# Allegro board LAY-94611_B2.brd
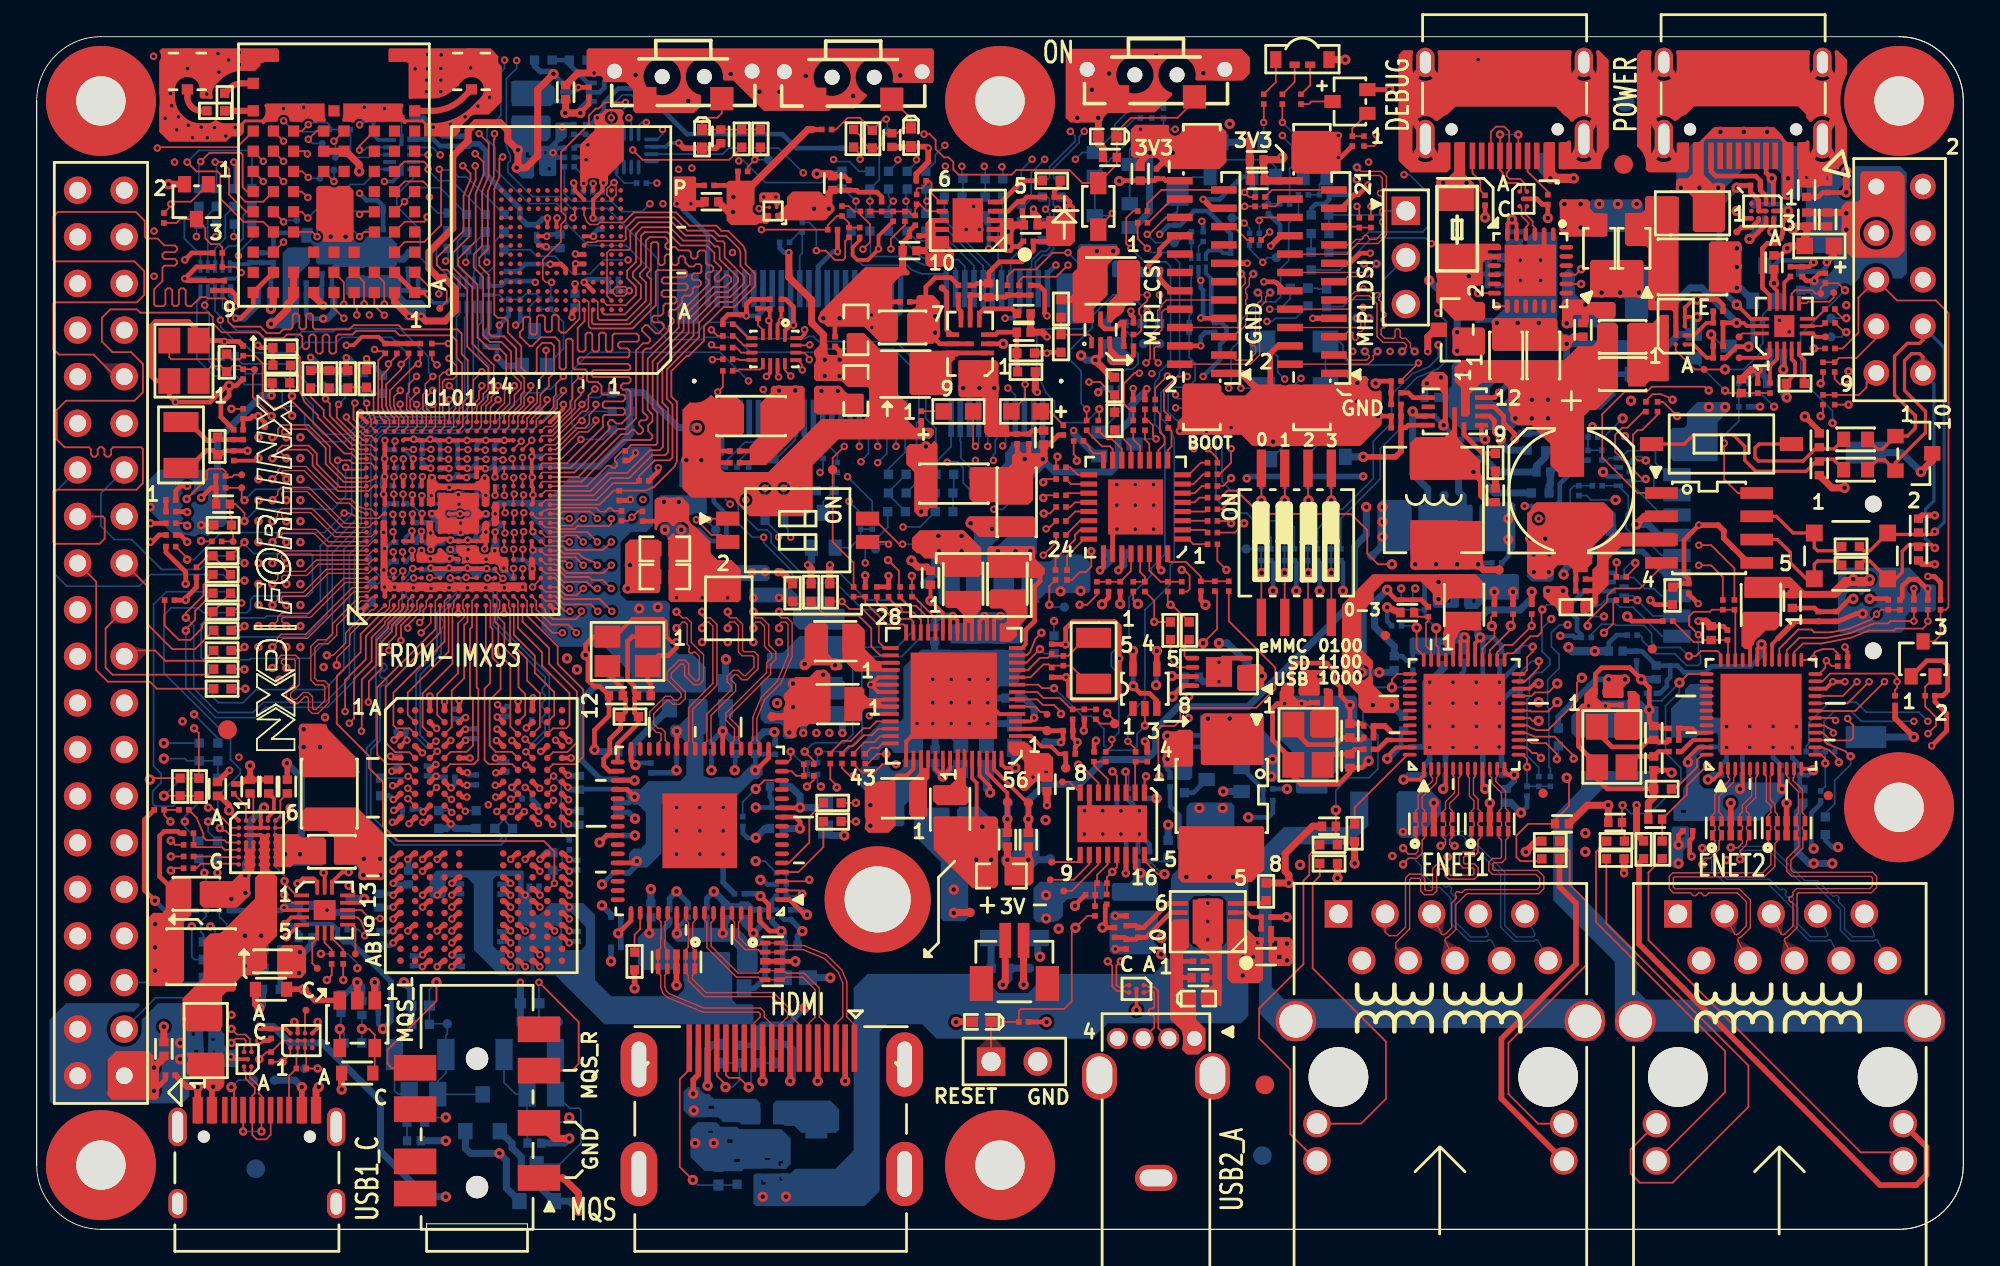
[diagram p0: board, top side]
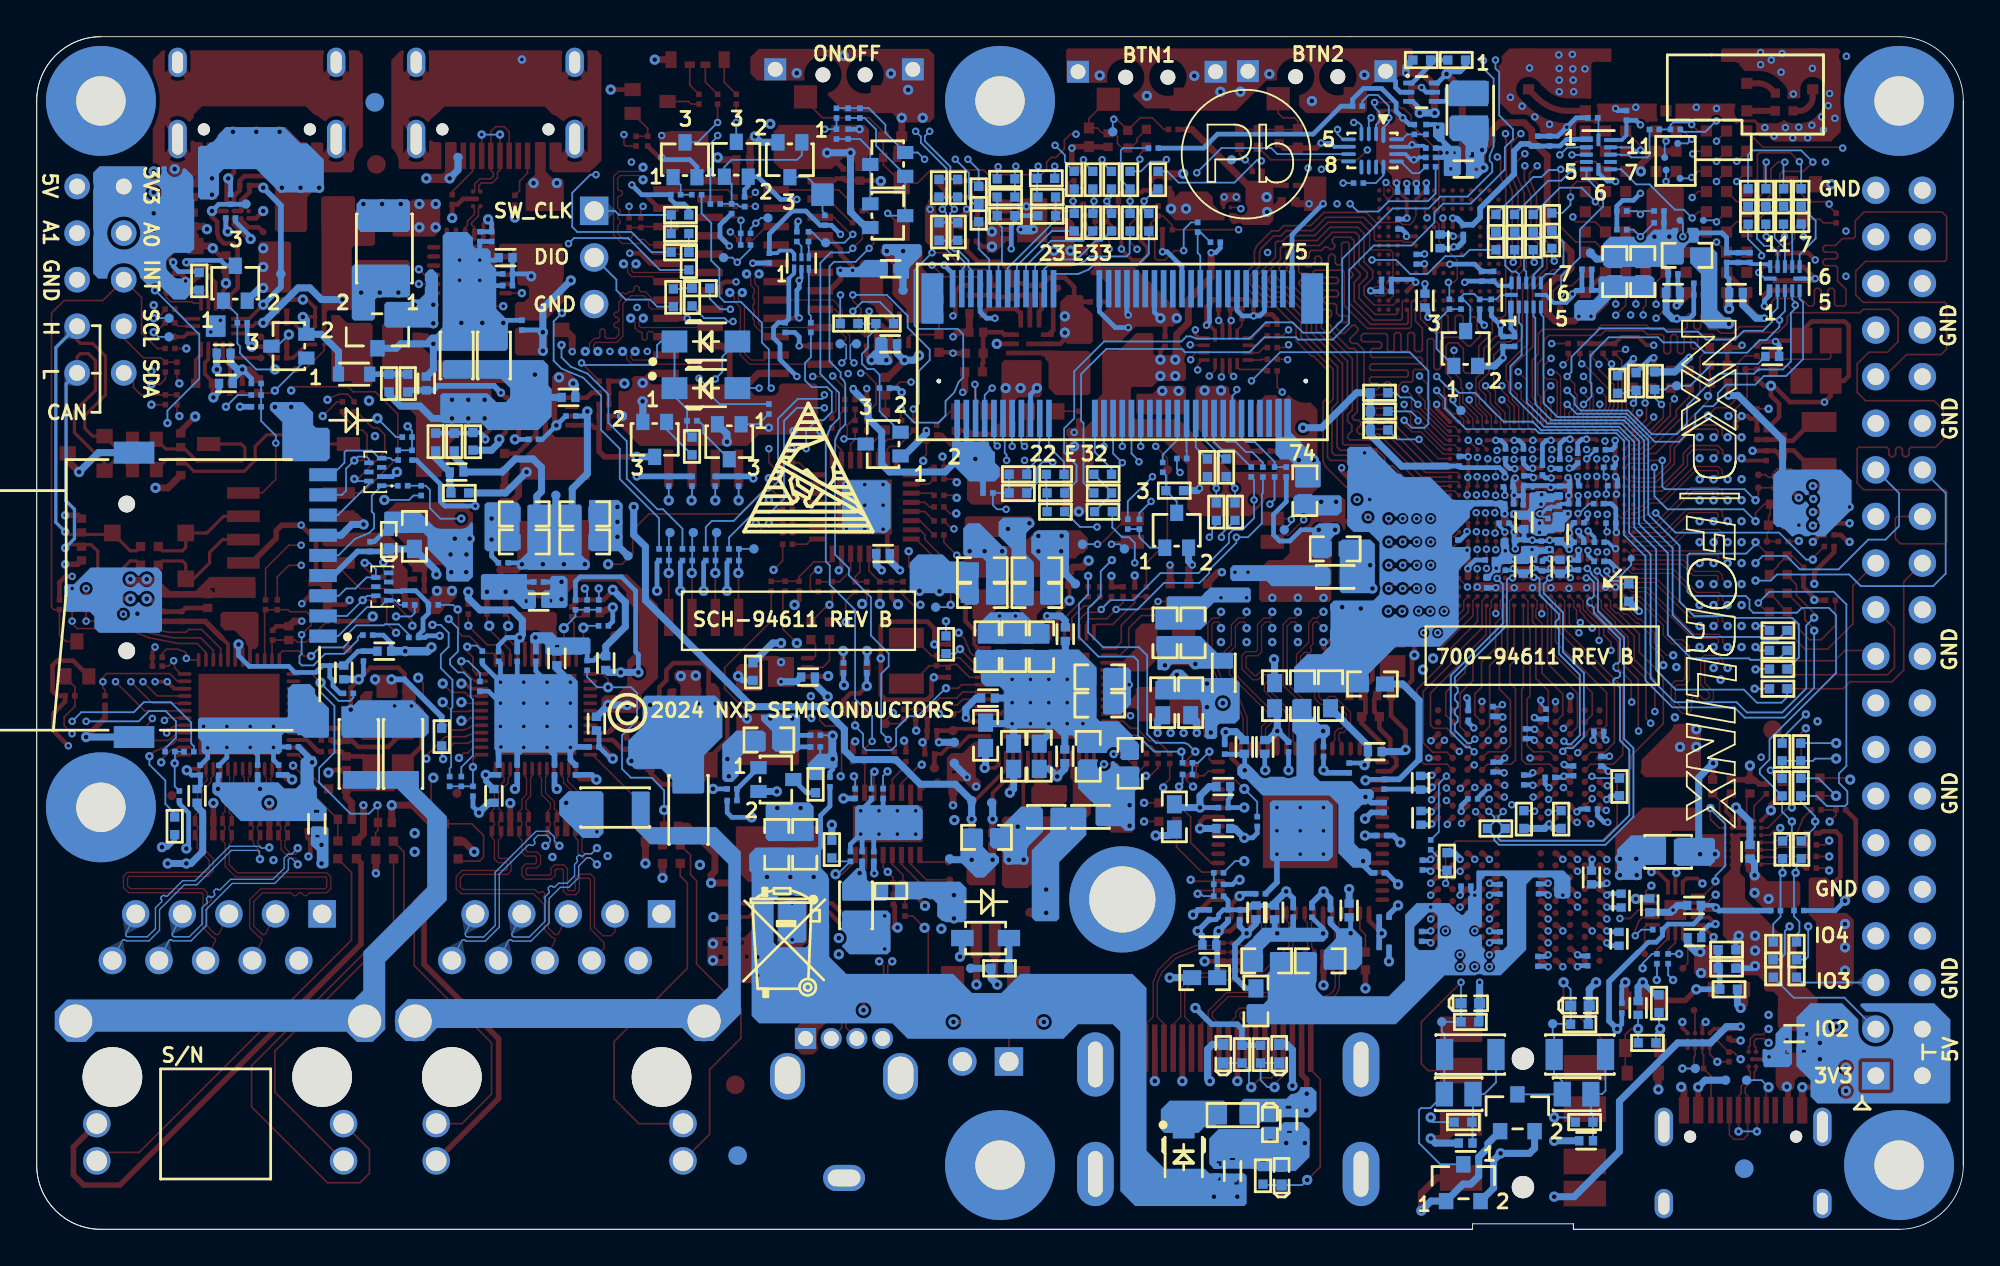
[diagram p1: board, bottom side, seen from below]

Outline 105 x 65 mm; copper layers: TOP, GND02, ART03, PWR04, PWR05, ART06, GND7, ART08, GND09, BOTTOM. Coordinates in mm from the lower left corner of the outline.
Outline path: 0,61.5 0,3.5 ; 0,61.5 arc(1.03,63.97) 3.5,65 101.5,65 ; 0,61.5 0,3.5 ; 0,3.5 arc(1.03,1.03) 3.5,0 ; 3.5,0 21.25,0 ; 3.5,0 21.25,0 ; 21.25,0 21.25,0.3 ; 21.25,0 21.25,0.3 ; 21.25,0.3 26.75,0.3 26.75,0 ; 26.75,0 52.5,0 ; 26.75,0 101.5,0 ; 26.75,0 101.5,0 ; 101.5,0 arc(103.97,1.03) 105,3.5 ; 101.5,0 arc(103.97,1.03) 105,3.5 ; 101.5,65 arc(103.97,63.97) 105,61.5 ; 101.5,65 arc(103.97,63.97) 105,61.5 ; 105,61.5 105,3.5 ; 105,61.5 105,3.5

## Design rules (mm)
constraint set DEFAULT: min track width 0.092
net group AA18_SD2_DATA1: nets AA18_SD2_DATA1 SD_DATA1
net group AA19_SD2_CLK: nets AA19_SD2_CLK SD_CLK
net group AA20_SD2_DATA3: nets AA20_SD2_DATA3 SD_DATA3
net group DEBUG_D: nets DEBUG_DN DEBUG_DP
net group DIFFPAIR13: nets A14_USB1_D_N B14_USB1_D_P
net group DIFFPAIR14: nets A15_USB2_D_N B15_USB2_D_P
net group DIFFPAIR20: nets N115899604 N115899615
net group EXP_GPIO_IO02: nets EXP_GPIO_IO02 K20_GPIO_IO02
net group EXP_GPIO_IO03: nets EXP_GPIO_IO03 K21_GPIO_IO03
net group EXP_GPIO_IO08: nets EXP_GPIO_IO08 M20_GPIO_IO08
net group EXP_GPIO_IO09: nets EXP_GPIO_IO09 M21_GPIO_IO09
net group EXP_GPIO_IO10: nets EXP_GPIO_IO10 N17_GPIO_IO10
net group EXP_GPIO_IO11: nets EXP_GPIO_IO11 N18_GPIO_IO11
net group M2_SD_CLK: nets M2_SD_CLK V16_SD3_CLK
net group M2_SD_CMD: nets M2_SD_CMD U16_SD3_CMD
net group M2_SD_DATA0: nets M2_SD_DATA0 T16_SD3_DATA0
net group M2_SD_DATA1: nets M2_SD_DATA1 V14_SD3_DATA1
net group M2_SD_DATA2: nets M2_SD_DATA2 U14_SD3_DATA2
net group M2_SD_DATA3: nets M2_SD_DATA3 T14_SD3_DATA3
net group M2_USB_D: nets M2_USB_DN M2_USB_DP
net group SD2_NDET: nets SD2_NDET Y17_SD2_NCD
net group SD_CMD: nets SD_CMD Y19_SD2_CMD
net group SD_DATA0: nets SD_DATA0 Y18_SD2_DATA0
net group SD_DATA2: nets SD_DATA2 Y20_SD2_DATA2
net group USB2_HOST_D: nets USB2_HOST_DN USB2_HOST_DP
net group USB_DEBUG_D: nets USB_DEBUG_DN USB_DEBUG_DP
net group USBC1_D: nets USBC1_DM USBC1_DP
net group Y11_SD1_CLK: nets N108612321 Y11_SD1_CLK
net group CLK: nets A18_CLKIN2 AA3_ENET2_RXC AA7_ENET1_RXC AA11_ENET1_MDC AA17_SD2_RESET_B B17_CLKIN1 BT_154_RST BT_RST C20_I2C1_SCL CAM_MCLK CAM_SCL CSI_NRST CTP_RST D20_I2C2_SCL DDC_SCL DDCSCL DRAM_NRESET DSI_SCL ENET1_NRST ENET1_RST ENET2_NRST ENET2_RST G17_PDM_CLK G20_SAI1_TXC I2C1_SCL I2C3_SCL I2C4_SCL I2C_IND_RST_15_4 I3C1_SCL I3C2_SCL I3C_SCL LD_I2C_SCL LVDS_NRST LVDS_RST M2_I2C_SCL M2_NPERST M2_PCM_CLK M2_SD_NRST PCF2131_SCL PD_I2C_SCL PMIC_SCLL RTC_CLK SD3_NRST SPI3_CLK SUSCLK SYS_NRST U4_CSI_MCLK U6_ENET2_TXC U10_ENET1_TXC USB_I2C_SCL USBC_I2C_SCL V4_CCM_CLKO4 VEN_SPI_CLK W2_BT_154_RST W2_JTAG_TCK W2_PCM_CLK W2_PCM_MCLK W2_SD_CLK W2_SPI3_CLK W2_WL_RST Y1_JTAG_TCK
net group POWER: nets ANVDD_1V8 APVDD_1V8 AVCC_3V3 CAN_VDD_5V CAN_VIO_3V3 DBG_ACC DEBUG_5V DSI&CAM_3V3 E14_USB2_VBUS_3V3 ENET1_AVDD3 ENET1_AVDDL ENET1_DVDD3 ENET1_DVDD_RGMII ENET1_DVDDL ENET2_AVDD3 ENET2_AVDDL ENET2_DVDD3 ENET2_DVDD_RGMII ENET2_DVDDL F12_USB1_VBUS_3V3 GND HDMI_5V ILIM_5V_VBUS IVDD_1V8 LPD4/X_VDD1 LPD4/X_VDD2 LPD4/X_VDDQ LPD4X_VDDQ_0V6 NVCC_BBSM_1V8 OVDD_3V3 PD_ILIM_5V_VBUS PVCC1_1V8 PVCC2_1V8 TXAVCC_1V8 TXAVCC_3V3 TXEMEM_VPP USB1_VBUS_IN USB_PD_VBUS_F VBBS VBUS1_DET_3V3 VBUS2_DET_3V3 VBUS_IN VBUS_USB2_5V VCC_3V3_DEBUG VCC_3V6 VDD_3V3 VDD_5V VDD_ANA_0V8 VDD_ANA_1V8 VDD_COIN_3V VDD_SNVS_0V8 VDD_SOC_0V8 VEXP_3V3 VEXP_5V VEXT_1V8 VINT VLDO1_3V3 VLDO3_1V8 VLDO_3V3 VPCIE_3V3 VSD_3V3 VSYS_5V

## Placement (name value [footprint] x y rotation side)
BH1  SMTSO-M2.5-5ET  [MH244-166T_202H]  45.83 17.98 180 bottom
BH2  MOUNTING HOLE  [HOLE2_7_6]  3.5 61.5 0 top
BH3  MOUNTING HOLE  [HOLE2_7_6]  52.5 61.5 0 top
BH4  MOUNTING HOLE  [HOLE2_7_6]  101.5 61.5 0 top
BH5  MOUNTING HOLE  [HOLE2_7_6]  101.5 23 0 top
BH6  MOUNTING HOLE  [HOLE2_7_6]  52.5 3.5 0 top
BH7  MOUNTING HOLE  [HOLE2_7_6]  3.5 3.5 0 top
C101  1uF  [C0201]  21.25 39.54 0 bottom
C102  1uF  [C0201]  21.19 40.53 0 bottom
C106  1uF  [C0201]  23.72 39.49 0 bottom
C107  1uF  [C0201]  22.02 39.16 90 bottom
C108  10uF  [C0402]  22.02 37.88 270 bottom
C109  1uF  [C0201]  23.72 39.98 0 bottom
C110  1uF  [C0201]  21.99 40.25 90 bottom
C111  1uF  [C0201]  22.56 39.56 270 bottom
C114  1uF  [C0201]  22.64 38.48 90 bottom
C116  1uF  [C0201]  22.52 24.63 180 bottom
C117  1uF  [C0201]  26.73 23.46 0 bottom
C118  1uF  [C0201]  19.88 39.55 180 bottom
C119  1uF  [C0201]  29.82 52.87 90 bottom
C124  10uF  [C0402]  23.95 38.54 270 bottom
C129  1uF  [C0201]  27.46 41.86 90 bottom
C130  1uF  [C0201]  22.94 41.38 90 bottom
C131  1uF  [C0201]  20.95 37.45 0 bottom
C132  1uF  [C0201]  21.99 41.71 90 bottom
C134  1uF  [C0201]  24.81 40.46 180 bottom
C135  1uF  [C0201]  20.95 38.51 0 bottom
C136  10uF  [C0402]  23.98 36.11 270 bottom
C137  1uF  [C0201]  23.94 37.33 90 bottom
C138  1uF  [C0201]  25.97 35.23 270 bottom
C139  1uF  [C0201]  20.2 22.91 0 bottom
C140  1uF  [C0201]  24.96 36.19 270 bottom
C141  1uF  [C0201]  29.49 19.85 270 bottom
C142  22uF  [C0603]  34.23 35.56 0 top
C143  22uF  [C0603]  34.23 37.08 0 top
C144  1uF  [C0201]  19.85 36.4 180 bottom
C145  1uF  [C0201]  25.03 38.49 180 bottom
C146  1uF  [C0201]  23.93 40.8 270 bottom
C147  1uF  [C0201]  21.02 42.03 90 bottom
C148  1uF  [C0201]  19.77 42.48 180 bottom
C149  1uF  [C0201]  19.84 37.45 180 bottom
C151  10uF  [C0402]  21.98 36.11 270 bottom
C152  1uF  [C0201]  19.86 27.13 180 bottom
C153  1uF  [C0201]  20.48 14.63 270 bottom
C154  1uF  [C0201]  25.24 15.95 270 bottom
C155  1uF  [C0201]  27.25 54.48 270 bottom
C156  1uF  [C0201]  24.72 37.52 180 bottom
C201  10uF  [C0402]  29.58 24.34 270 bottom
C202  10uF  [C0402]  18.65 17.91 90 bottom
C203  1uF  [C0201]  30.81 54.79 270 bottom
C204  1uF  [C0201]  27.55 37.3 90 bottom
C205  1uF  [C0201]  24.77 39.54 180 bottom
C206  10uF  [C0402]  29.56 22.42 90 bottom
C207  10uF  [C0402]  20.26 19.18 90 bottom
C208  1uF  [C0201]  25.62 25.19 90 bottom
C209  1uF  [C0201]  29.52 56.54 180 bottom
C210  1uF  [C0201]  23 37.24 90 bottom
C211  1uF  [C0201]  25.26 18.53 270 bottom
C212  1uF  [C0201]  25.79 36.48 0 bottom
C213  1uF  [C0201]  23.14 18.56 270 bottom
C214  1uF  [C0201]  23.96 24.49 270 bottom
C215  10uF  [C0402]  18.76 15.83 270 bottom
C216  1uF  [C0201]  29.52 15.96 270 bottom
C217  1uF  [C0201]  21.24 24.99 270 bottom
C218  1uF  [C0201]  23.19 14.61 270 bottom
C219  1uF  [C0201]  26.97 28.01 90 bottom
C220  1uF  [C0201]  20.98 36.21 270 bottom
C221  1uF  [C0201]  23.86 27.01 90 bottom
C222  1uF  [C0201]  22.94 36.15 270 bottom
C401  18pF  [C0201]  10.74 43.31 90 top
C402  18pF  [C0201]  10.74 42.16 270 top
C403  18pF  [C0201]  11.25 46.61 270 top
C404  18pF  [C0201]  11.25 47.88 90 top
C405  100nF  [C0402]  10.15 39.52 180 top
C501  4.7uF  [C0402]  28.52 53.85 270 bottom
C502  220nF  [C0201]  23.97 42.27 90 bottom
C503  220nF  [C0201]  24.95 42.27 90 bottom
C504  10uF  [C0402]  29.34 50.62 270 bottom
C505  220nF  [C0201]  19.75 25.52 90 bottom
C506  220nF  [C0201]  30.57 56.54 180 bottom
C507  220nF  [C0201]  27.11 18.7 0 bottom
C508  220nF  [C0201]  31.44 51.12 180 bottom
C509  1uF  [C0201]  31.44 51.78 180 bottom
C701  10uF  [C0603]  47.06 30.1 180 bottom
C702  10uF  [C0603]  47.06 28.57 180 bottom
C703  22uF  [C0603]  47.7 25.78 90 bottom
C704  1uF  [C0402]  48.97 25.78 90 bottom
C705  22uF  [C0603]  45.41 25.4 90 bottom
C706  1uF  [C0402]  53.16 28.96 180 bottom
C707  22uF  [C0603]  42.11 28.7 270 bottom
C708  22uF  [C0603]  43.63 28.7 270 bottom
C709  10uF  [C0603]  51.76 25.78 270 bottom
C710  22uF  [C0603]  43.51 32.51 90 bottom
C711  22uF  [C0603]  41.98 32.51 90 bottom
C712  10uF  [C0603]  53.21 31.75 90 bottom
C713  10uF  [C0603]  53.28 26.92 270 bottom
C714  22uF  [C0603]  50.49 35.94 0 bottom
C715  22uF  [C0603]  50.49 34.54 0 bottom
C716  18pF  [C0201]  55.32 30.35 270 top
C717  18pF  [C0201]  55.32 31.62 90 top
C718  10uF  [C0603]  51.73 31.75 90 bottom
C719  22uF  [C0603]  53.46 34.54 0 bottom
C720  22uF  [C0603]  53.46 35.94 0 bottom
C721  10uF  [C0603]  50.24 31.75 90 bottom
C722  22uF  [C0603]  52.57 19.25 0 top
C723  22uF  [C0603]  53.23 21.36 0 bottom
C724  1uF  [C0402]  48.94 32.44 90 bottom
C725  4.7uF  [C0402]  48.71 35.51 90 top
C726  10uF  [C0603]  50.36 25.78 90 bottom
C727  1uF  [C0201]  56.21 27.18 0 top
C728  1uF  [C0201]  56.33 25.91 0 top
C729  4.7uF  [C0402]  52.9 21.23 270 top
C730  4.7uF  [C0402]  55.06 24.26 270 top
C731  4.7uF  [C0402]  54.05 21.23 270 top
C810  18pF  [C0201]  33.01 38.86 270 top
C813  18pF  [C0201]  56.46 28.07 270 top
C814  100nF  [C0402]  10.41 47.57 180 bottom
C815  100nF  [C0402]  62.96 30.1 180 bottom
C817  1uF  [C0201]  10.03 41.05 180 top
C818  1uF  [C0201]  10.03 40.41 180 top
C819  220nF  [C0402]  79.5 40.01 270 top
C820  10uF  [C0805]  82.11 47.62 90 bottom
C821  10uF  [C0805]  82.11 47.62 90 top
C822  DNP  [C0402]  82.11 41.27 180 bottom
C823  10uF  [C0805]  80.08 47.62 90 bottom
C824  10uF  [C0805]  80.08 47.62 90 top
C825  100nF  [C0402]  76.02 45.34 180 bottom
C826  100nF  [C0402]  58.49 58.42 180 top
C827  22uF  [C0603]  78.43 37.47 0 bottom
C828  22uF  [C0603]  78.43 38.99 0 bottom
C829  22uF  [C0603]  75.13 37.47 180 bottom
C830  22uF  [C0603]  75.13 38.99 180 bottom
C831  100nF  [C0201]  79.57 36.32 0 bottom
C832  100nF_DNP  [C0402]  83.76 46.1 90 bottom
C833  100nF  [C0201]  75.89 44.32 0 bottom
C834  1uF  [C0201]  77.92 43.05 180 bottom
C835  100nF  [C0402]  46.61 59.36 270 top
C836  100nF  [C0402]  37.28 59.56 270 top
C837  22uF  [C0603]  65.1 26.67 0 bottom
C838  1uF  [C0201]  62.56 26.92 180 bottom
C839  22uF  [C0603]  64.66 20.98 90 bottom
C840  22uF  [C0603]  63.14 20.98 90 bottom
C842  100uF  [CCE6P3X7P7]  83.64 40.26 270 top
C843  4.7uF  [C1210]  90.24 52.45 0 top
C844  220nF  [C0402]  92.91 45.95 90 top
C845  2.2uF  [C0402]  94.69 46.1 0 bottom
C846  4.7uF  [C0402]  94.81 47.75 180 bottom
C847  100nF  [C0402]  94.69 52.7 270 top
C848  100nF  [C0201]  94.43 55.12 180 bottom
C849  4.7uF  [C1210]  86.05 53.45 90 bottom
C850  2.2uF  [C0402]  84.27 49.02 270 top
C851  100nF  [C0402]  17.72 12.06 90 bottom
C852  100nF  [C0201]  12.77 10.67 270 top
C853  4.7uF  [C1210]  8.96 14.86 180 top
C854  2.2uF  [C0402]  14.65 15.9 180 bottom
C855  4.7uF  [C0402]  14.68 17.65 0 bottom
C856  100nF  [C0402]  17.09 17.65 90 bottom
C857  10uF  [C0402]  76.65 31.11 270 bottom
C858  100nF  [C0201]  77.8 31.22 270 bottom
C859  1uF  [C0201]  78.81 31.22 270 bottom
C860  100nF  [C0201]  79.83 31.22 270 bottom
C861  1uF  [C0201]  79.83 25.04 90 bottom
C862  100nF  [C0201]  75.64 25.04 90 bottom
C863  100nF  [C0201]  74.62 26.29 0 bottom
C864  100nF  [C0201]  76.78 25.04 90 bottom
C865  100nF  [C0201]  78.81 25.04 90 bottom
C866  10uF  [C0402]  77.64 34.19 0 bottom
C867  100nF  [C0201]  77.64 35.28 0 bottom
C868  1uF_DNP  [C0201]  68.65 29.34 180 top
C869  22pF  [C0402]  71.57 27.18 90 top
C870  22pF  [C0402]  71.57 25.53 270 top
C871  10uF  [C0402]  88.27 30.35 270 bottom
C872  100nF  [C0201]  87.19 31.24 270 bottom
C873  1uF  [C0201]  98.06 33.4 90 top
C874  100nF  [C0201]  97.1 33.4 90 top
C875  1uF  [C0201]  96.08 25.02 90 bottom
C876  100nF  [C0201]  91.82 25.04 90 bottom
C877  100nF  [C0201]  92.96 25.04 90 bottom
C878  100nF  [C0201]  91 26.29 0 bottom
C879  100nF  [C0201]  95.07 25.02 90 bottom
C880  10uF  [C0402]  95.68 34.24 270 top
C881  100nF  [C0201]  89.99 21.72 0 top
C882  1uF_DNP  [C0201]  85.21 29.29 180 top
C883  22pF  [C0402]  88.13 27.05 90 top
C884  22pF  [C0402]  88.13 25.4 270 top
C885  10uF  [C0402]  41.09 15.49 0 bottom
C886  100nF  [C0201]  40.08 17.14 90 bottom
C887  10uF  [C0402]  40.33 24.13 180 bottom
C888  100nF  [C0201]  40.33 22.99 180 bottom
C889  10uF  [C0402]  33.47 17.38 90 bottom
C890  100nF  [C0201]  34.49 17.16 90 bottom
C891  10uF  [C0402]  40.33 21.84 180 bottom
C892  100nF  [C0201]  31.57 17.02 180 bottom
C893  100nF  [C0201]  38.3 18.29 180 bottom
C894  100nF  [C0201]  31.57 24.26 270 bottom
C895  100nF  [C0201]  31.57 15.37 180 bottom
C896  10uF  [C0402]  32.08 26.04 180 bottom
C897  100nF  [C0201]  33.47 25.15 270 bottom
C898  10uF  [C0402]  38.07 26.29 270 bottom
C899  100nF  [C0201]  36.77 26.29 270 bottom
C900  100nF  [C0201]  31.69 21.46 0 bottom
C901  10uF  [C0402]  38.55 17.27 90 bottom
C902  100nF  [C0201]  39.44 17.14 90 bottom
C903  10uF  [C0402]  39.19 26.29 90 bottom
C904  100nF  [C0201]  40.25 26.16 90 bottom
C905  100nF  [C0201]  34.87 26.04 270 bottom
C906  100nF  [C0201]  31.57 22.99 270 bottom
C907  100nF  [C0201]  31.82 19.43 180 bottom
C908  10uF  [C0402]  37.54 17.27 90 bottom
C909  100nF  [C0201]  35.5 17.27 90 bottom
C910  100nF  [C0201]  36.52 17.27 90 bottom
C911  100nF  [C0201]  40.71 3.17 90 bottom
C912  10uF  [C0402]  39.82 3.17 90 bottom
C913  1uF  [C0402]  36.77 5.97 270 bottom
C914  15pF  [C0402]  33.09 29.08 180 top
C915  15pF  [C0402]  31.57 29.08 0 top
C916  1uF  [C0201]  40.58 18.16 180 bottom
C917  10uF  [C0402]  58.49 48.26 180 bottom
C918  10uF  [C0402]  58.47 52.35 0 bottom
C919  100nF  [C0201]  61.03 57.53 90 top
C920  100nF  [C0201]  64.21 49.15 270 bottom
C921  100nF  [C0201]  65.07 52.93 270 bottom
C922  10uF  [C0402]  66.49 58.29 180 top
C923  10uF  [C0402]  60.14 57.53 90 top
C924  10uF  [C0402]  66.54 57.16 180 top
C925  0.1uF  [C0402]  58.87 36.83 180 bottom
C926  100nF  [C0201]  59.05 35.03 270 top
C927  100nF  [C0201]  47.32 50.55 180 top
C928  47uF  [C0805]  47.19 49.15 180 top
C929  1000pF  [C0402]  53.79 48.9 180 top
C930  22uF  [C0603]  44.65 45.72 270 top
C931  22uF  [C0603]  44.65 49.02 90 top
C932  100nF  [C0201]  43.51 48.39 90 top
C933  1000pF  [C0402]  53.79 49.91 0 top
C934  0.1uF  [C0402]  51.89 51.18 90 top
C935  1uF  [C0201]  9.6 51.44 90 top
C936  10nF  [C0201]  10.23 51.44 90 top
C937  10nF  [C0201]  12.26 52.96 90 bottom
C938  1uF  [C0201]  11.63 52.96 90 bottom
C939  1uF  [C0201]  24.46 48.39 270 bottom
C940  10nF  [C0201]  25.09 48.39 270 bottom
C941  1uF  [C0201]  26.23 51.94 90 bottom
C942  10nF  [C0201]  25.6 51.94 90 bottom
C943  100nF  [C0201]  54.07 43.08 90 top
C944  100nF  [C0201]  53.44 43.08 90 top
C945  100nF  [C0201]  38.04 41.78 0 top
C946  100nF  [C0201]  38.04 42.42 0 top
C947  10uF  [C0402]  54.88 43.15 90 top
C948  100uF  [C1206]  53.41 39.62 270 top
C949  100uF  [C1206]  38.93 44.32 0 top
C950  100uF  [C1206]  49.98 40.64 180 top
C951  10uF  [C0402]  28.83 61.98 90 top
C952  10uF  [C0402]  27.25 57.78 0 bottom
C953  100nF  [C0201]  27.25 58.67 0 bottom
C954  22uF  [C0603]  18.99 52.2 90 bottom
C955  22uF  [C0603]  17.47 52.2 90 bottom
C956  1uF  [C0201]  20.52 52.32 0 bottom
C957  100nF  [C0201]  20.52 51.18 0 bottom
C958  100nF  [C0201]  12.9 52.96 90 bottom
C959  10uF  [C0402]  12.39 51.05 180 bottom
C960  22uF  [C0603]  35.89 40.26 270 bottom
C961  22uF  [C0603]  15.06 53.09 0 bottom
C962  1uF  [C0201]  14.42 50.93 0 bottom
C963  100nF  [C0201]  14.42 51.56 0 bottom
C964  100nF  [C0201]  15.82 52.07 0 bottom
C965  10uF  [C0402]  15.82 51.05 0 bottom
C966  10uF  [C0402]  36.77 56.01 180 top
C967  100nF  [C0201]  36.65 56.9 180 top
C968  10uF  [C0402]  43.38 57.02 90 top
C969  100nF  [C0201]  44.27 56.9 90 top
C970  10uF  [C0402]  6.93 9.83 90 top
C971  100nF  [C0201]  7.28 8.41 0 top
C972  10uF  [C0402]  9.22 10.67 0 bottom
C973  100nF  [C0201]  9.22 9.78 0 bottom
C976  10uF  [C0402]  54.17 54.74 0 top
C977  100nF  [C0201]  54.05 53.85 0 top
C978  10uF  [C0402]  47.57 53.34 180 top
C979  100nF  [C0201]  47.82 54.14 180 top
C980  100nF  [C0201]  55.19 56.26 0 top
C981  100nF  [C0201]  48.2 57.15 180 top
C982  10uF  [C0402]  97.61 55.04 270 top
C983  100nF  [C0402]  96.46 55.04 270 top
C984  10uF  [C0402]  96.46 56.64 90 top
C985  100nF  [C0201]  97.61 56.77 90 top
C986  22uF  [C0603]  84.42 37.77 90 bottom
C987  100nF  [C0201]  86.83 37.21 90 bottom
C988  22uF  [C0805]  27.5 7.37 0 bottom
C989  100uF  [C1206]  26.87 9.53 0 bottom
C990  0.033uF  [C0402]  27.12 4.7 0 bottom
C991  22uF  [C0805]  21.08 7.37 0 bottom
C992  100uF  [C1206]  20.9 9.53 0 bottom
C993  0.033uF  [C0402]  20.56 4.83 0 bottom
C994  4.7uF  [C0402]  79.45 52.96 0 bottom
C995  100nF  [C0201]  80.21 54.1 270 bottom
C996  100nF  [C0201]  79.34 52.07 0 bottom
C997  1uF  [C0201]  80.84 54.1 270 bottom
C998  100nF  [C0201]  39.95 50.42 90 top
C999  100nF  [C0201]  40.58 50.42 90 top
C1000  2.2uF  [C0201]  78.56 49.28 90 bottom
C1001  1uF  [C0201]  79.34 51.44 0 bottom
C1005  1uF  [C0201]  84.15 34.8 180 top
C1006  100nF  [C0201]  84.15 35.43 180 top
C1007  56PF  [C0402]  102.56 38.35 270 top
C1008  1uF  [C0201]  90.04 34.92 270 top
C1009  56PF  [C0402]  97.15 43 90 top
C1010  56PF  [C0402]  97.15 41.48 270 top
C1011  56PF  [C0402]  102.56 36.83 270 top
C1012  100nF  [C0402]  9.85 24 90 top
C1013  1nF  [C0402]  11.63 24.13 90 top
C1014  10nF  [C0402]  13.66 24.13 90 top
C1015  4.7uF  [C0402]  12.64 24.13 90 top
C1016  10uF  [C1210]  15.95 23.75 90 top
C1017  47uF  [C0805]  8.71 18.29 180 top
C1018  100nF  [C0402]  11.63 20.57 90 bottom
C1019  100nF  [C0201]  61.77 24.38 270 bottom
C1021  470pF  [C0402]  83.13 22.1 0 top
C1022  18pF  [C0402]  74.7 33.6 180 top
C1023  470pF  [C0402]  70.43 21.97 180 top
C1024  470pF  [C0402]  88.21 22.35 180 top
C1025  470pF  [C0402]  86.02 22.17 180 top
C1026  18pF  [C0402]  91.26 32.49 90 top
C1027  10uF  [C0402]  67 14.86 0 top
C1028  100nF  [C0201]  67 15.75 0 top
C1029  10uF  [C0402]  63.32 13.72 0 top
C1030  100nF  [C0201]  63.32 14.61 0 top
C1031  100nF  [C0201]  67 16.38 0 top
C1032  100nF  [C0201]  59.38 16.81 90 top
C1033  47uF  [C0805]  60.35 17.65 270 bottom
C1034  100nF  [C0201]  60.02 20.32 90 bottom
C1035  100nF  [C0201]  60.65 20.32 90 bottom
C1036  100nF  [C0201]  59.38 20.32 90 bottom
C1037  100nF  [C0201]  53.79 11.3 180 top
C1038  100nF  [C0201]  59.76 30.61 270 bottom
C1041  1uF  [C0201]  22.55 59.31 90 bottom
C1042  10nF  [C0201]  23.19 59.31 90 bottom
C1043  1uF  [C0201]  18.36 60.71 90 bottom
C1044  100nF  [C0201]  29.03 58.93 180 bottom
C1045  1uF  [C0201]  60.78 60.83 270 bottom
C1047  100nF  [C0201]  29.03 58.42 180 bottom
C1048  1000pF  [C1206]  69.48 22.86 270 bottom
C1049  1000pF  [C1206]  85.03 25.91 270 bottom
D601  LED RED  [LED0603]  97.16 53.59 180 top
D602  ESD5451N-2/TR  [0402TVS]  58.36 59.56 180 top
D603  BZX585-B3V3  [SOD523]  87.7 46.61 0 bottom
D604  ESD5451N-2/TR  [0402TVS]  47.65 59.52 270 top
D605  ESD5451N-2/TR  [0402TVS]  36.27 59.44 270 top
D606  BAT54HT1  [SOD323]  87.07 53.47 0 top
D607  BAT54HT1  [SOD323]  85.16 53.47 0 top
D608  BZX585-B3V3  [SOD523]  12.77 13.08 180 top
D609  ESD5451N-2/TR  [0402TVS]  37.79 5.71 270 bottom
D610  ESD5341N  [0402TVS]  40.33 9.57 90 bottom
D611  ESD5341N  [0402TVS]  37.28 9.57 90 bottom
D612  ESD5341N  [0402TVS]  37.16 2.92 90 bottom
D613  LED GREEN  [LED0603]  53.92 44.58 180 top
D614  LED_ORANGE  [LED0603]  50.24 44.58 0 top
D615  ESD5451N-2/TR  [0402TVS]  85.81 37.59 90 bottom
D616  PUSB3AB6Z  [DFN2111_7]  86.07 35.03 0 bottom
D617  PUSB3AB6Z  [DFN2111_7]  86.45 41.27 0 bottom
D618  BAT54S  [SOT23_A]  27.25 2.54 180 bottom
D619  ESD5451N-2/TR  [0402TVS]  26.87 12.32 180 bottom
D620  ESD5451N-2/TR  [0402TVS]  20.89 12.19 180 bottom
D621  BAT54S  [SOT23_A]  24.3 6.35 180 bottom
D623  PSM712-LF-T7  [SOT23_A]  102.31 42.29 270 top
D624  RB521S-30  [SOD523]  17.47 8.51 180 top
D626  ESD5451N-2/TR  [0402TVS]  63.32 12.57 0 top
D627  BAT54HT1  [SOD323]  53.28 15.88 90 bottom
D628  ESD5451N-2/TR  [0402TVS]  51.51 11.3 180 top
D629  BAT54HT1  [SOD323]  57.86 55.75 180 top
F1  7A  [FUSE_3P4X1P8]  90.24 55.37 180 top
F2  7A  [FUSE_3P4X1P8]  9.22 10.29 90 top
F3  FUSE_0.5A  [F1206]  77.41 54.36 270 top
F5  FUSE_0.04A  [F0603]  39.82 6.22 180 bottom
FB16  1K  [FB0603]  34.23 37.08 180 bottom
FB17  120 Ohm  [FB0402]  73.99 30.86 90 bottom
FB18  120 Ohm  [FB0402]  80.08 23.62 90 bottom
FB19  120 Ohm  [FB0402]  74.49 27.56 270 bottom
FB20  120 Ohm  [FB0402]  86.06 31.51 0 bottom
FB21  120 Ohm  [FB0402]  96.26 23.62 90 bottom
FB22  120 Ohm  [FB0402]  89.73 22.1 90 bottom
FB23  60 Ohm  [FB0603]  41.35 13.72 180 bottom
FB24  60 Ohm  [FB0603]  43 22.48 90 bottom
FB25  60 Ohm  [FB0603]  35.05 14.63 180 bottom
FB26  60 Ohm  [FB0603]  32.2 29.72 180 bottom
FB27  60 Ohm  [FB0603]  34.49 29.08 270 bottom
FB28  60 Ohm  [FB0603]  37.54 29.08 270 bottom
FB29  60 Ohm  [FB0603]  38.55 12.45 90 bottom
FB30  60 Ohm  [FB0603]  36.01 29.08 270 bottom
FB31  60 Ohm  [FB0603]  37.97 14.63 0 bottom
K1  -  [KEY_3_5X7]  61 62.92 180 top
K2  -  [KEY_3_5X7]  44.5 62.79 180 top
K3  -  [KEY_3_5X7]  35.24 62.82 180 top
L701  0.47uH  [IND_2016A]  47.19 23.5 180 top
L702  0.47uH  [IND_2016A]  43.66 28.63 180 top
L703  0.47uH  [IND_2016A]  43.53 32.05 180 top
L704  0.47uH  [IND_2016A]  50.49 35.18 90 top
L705  0.47uH  [IND_2016A]  52.9 35.18 90 top
L706  0.47uH  [IND_2016A]  49.78 22.89 270 top
L707  1.5uH  [IND_0518]  76.14 39.75 270 top
L708  2.2uH  [IND_2016A]  77.8 34.04 90 top
L709  2.2uH  [IND_2016A]  93.97 34.04 90 top
L710  1.0uH  [IND_SPH2520]  58.49 51.69 180 top
L711  0.47uH  [IND_SPH2520]  47.32 46.61 180 top
L712  1.0uH  [IND_SPH2520]  26.87 60.96 270 bottom
L713  DLW43SH510XK2  [IND_DLW43]  98.88 36.7 0 top
LED1  RGB_LED  [SMD_RGB_1_5X3]  68.98 63.42 180 top
NOREF  -  [unnamed]  10.4 27.23 0 top
NOREF#2  -  [#2]  3.5 70 0 top
NOREF#3  -  [#2]  -26.03 -18.71 0 top
NOREF#4  -  [#2]  -24.47 -34.57 0 top
NOREF#5  -  [#2]  110 0 0 top
NOREF#6  -  [#2]  -150.27 73 0 top
NOREF#7  -  [#2]  -293.87 -184.4 0 top
NOREF#8  -  [#2]  105 136.36 90 top
NOREF#9  -  [#2]  276.75 -58.31 0 top
NOREF#10  -  [unnamed]  66.93 7.87 0 top
NOREF#11  -  [unnamed]  86.49 58.04 0 top
NOREF#12  -  [#2]  -267.86 340.75 0 top
NOREF#13  -  [#2]  3.5 3.5 0 top
NOREF#14  -  [#2]  3.5 135 0 top
NOREF#15  -  [#2]  0 0 0 top
NOREF#16  -  [#2]  129.97 24.66 0 top
NOREF#17  -  [#2]  3.5 65 0 top
NOREF#18  -  [#2]  47.42 -99.42 0 top
NOREF#19  -  [#2]  105 136.36 0 top
NOREF#20  -  [#2]  0 0 0 top
NOREF#21  -  [#2]  -293.87 -184.4 0 top
NOREF#22  -  [#2]  -30.39 -12.62 0 top
NOREF#23  -  [#2]  0 139.54 90 top
NOREF#24  -  [#2]  3.5 3.5 0 top
NOREF#25  -  [unnamed]  11.94 3.3 180 bottom
NOREF#26  -  [unnamed]  86.57 61.42 180 bottom
NOREF#27  -  [#2]  63.63 41.02 180 bottom
NOREF#28  -  [unnamed]  66.8 4.02 180 bottom
NOREF#29  -  [#2]  61.72 15.75 180 bottom
P1  Type_C_16P  [TYPEC_16P_S]  93.23 61.36 180 top
P2  Type_C_16P  [TYPEC_16P_S]  11.77 3.64 0 top
P3  FC-H021LNL  [RJ45-GIGABIT]  76.92 10.45 180 top
P4  FC-H021LNL  [RJ45-GIGABIT]  95.42 10.45 180 top
P5  HDMI_A  [HDMIA19_HDMI_01A]  39.91 4.77 180 top
P6  -  [FPC_22P_0_5]  63.5 51.9 90 top
P7  -  [FPC_22P_0_5]  69.5 51.9 90 top
P8  M.2 SKT KEY-E  [CON_75_0P5_22X9_RA1]  45.83 47.91 180 bottom
P9  U_FL_DNP  [IPEX_4]  23.69 63.11 90 top
P10  U_FL_DNP  [IPEX_4]  8.21 63.11 90 top
P11  TSM-120-01-F-DV-A  [HDR220_TSM_A_SM]  3.55 32.46 90 top
P12  Header-5x2-2.54  [HEADER5X2_25]  101.6 51.73 270 top
P13  CONN_SD_CARD 9  [CON9_SDCARD_1P1MM]  96.36 33.83 270 bottom
P14  Header-5x1-2.54  [HEADER_2_54_3P]  74.62 52.97 270 top
P15  PJ_3536X  [PJ3930_8P]  24 6.37 90 top
P16  Type_C_16P  [TYPEC_16P_S]  80.23 61.36 180 top
P17  -  [USB_A_V]  61 10.4 0 top
P18  JST_SH_2P  [SH_2P]  53.28 15.75 0 top
P19  Header-2x1-2.54  [HEADER_2X1_254]  53.28 9.14 0 top
Q1  L2SK3018WT1G  [SC70_3]  64.71 24.51 270 bottom
Q2  L2SK3018WT1G  [SC70_3]  66.87 58.32 180 bottom
Q3  L2SK3018WT1G  [SC70_3]  69.67 58.29 180 bottom
Q4  L2SK3018WT1G  [SC70_3]  71.57 61.47 90 top
Q5  L2SK3018WT1G  [SC70_3]  63.95 58.29 0 bottom
Q6  L2SK3018WT1G  [SC70_3]  91.26 48.13 90 bottom
Q7  L2SK3018WT1G  [SC70_3]  94.18 51.56 180 bottom
Q8  L2SK3018WT1G  [SC70_3]  42.87 38.1 180 bottom
Q9  L2SK3018WT1G  [SC70_3]  71.32 43.05 0 bottom
Q15  L2SK3018WT1G  [SC70_3]  67.25 42.93 0 bottom
Q16  L2SK3018WT1G  [SC70_3]  58.87 42.8 90 bottom
Q17  L2SK3018WT1G  [SC70_3]  8.71 56.01 180 top
Q18  L2SK3018WT1G  [SC70_3]  27.12 48.01 180 bottom
Q21  CJ2101  [SC70_3]  58.62 58.04 90 bottom
Q22  L2SK3018WT1G  [SC70_3]  58.62 55.24 270 bottom
Q23  L2SK3018WT1G  [SC70_3]  102.81 31.09 0 top
QZ401  32.768KHZ  [XTAL2-3P2X1P5-SM]  7.86 42.75 90 top
QZ701  32.768KHZ  [XTAL2-3P2X1P5-SM]  57.6 30.99 270 top
R111  0  [R0603]  34.23 35.56 180 bottom
R145  10K  [R0201]  61.03 30.61 90 bottom
R201  10K  [R0402]  28.14 20.07 90 bottom
R204  120R  [R0402]  18.23 34.68 270 bottom
R205  150  [R0402]  25.47 21.84 0 bottom
R207  10K  [R0402]  21.92 22.35 90 bottom
R208  10K  [R0402]  23.95 22.35 90 bottom
R209  240 OHM  [R0201]  22.74 28.08 90 bottom
R210  0  [R0402]  18.74 24.13 90 bottom
R301  0  [R0201]  7.31 37.85 180 top
R302  200  [R0201]  19.21 38.49 0 bottom
R303  200  [R0201]  19.11 40.53 180 bottom
R304  0  [R0201]  7.31 39.12 180 top
R305  200  [R0201]  19.34 41.53 180 bottom
R310  10K  [R0402]  31.82 44.58 180 bottom
R311  10K  [R0402]  31.82 45.59 180 bottom
R312  4.7K  [R0402]  31.82 43.56 180 bottom
R401  100K  [R0402]  13.33 46.13 0 top
R403  10K  [R0402]  69.92 55.28 180 bottom
R404  100K  [R0402]  10.15 38.38 0 top
R405  100K  [R0402]  16.81 46.23 270 bottom
R406  0  [R0201]  9.81 37.49 0 top
R411  0  [R0201]  11.25 44.45 270 top
R412  0  [R0201]  11.25 43.31 270 top
R413  4.7M  [R0402]  9.85 42.67 270 top
R414  510K  [R0402]  10.36 47.24 90 top
R415  100K  [R0402]  13.33 48.06 180 top
R416  100K  [R0402]  14.93 46.35 90 top
R417  100K  [R0402]  15.95 46.35 90 top
R418  100K  [R0402]  13.33 47.09 180 top
R501  10K  [R0201]  32.08 42.16 90 top
R502  10K  [R0201]  31.74 39.99 90 top
R605  1.0K  [R0402]  96.14 51.69 90 bottom
R702  0  [R0603]  49.98 22.48 180 bottom
R703  100K  [R0201]  57.09 28.07 90 top
R704  0  [R0603]  47.57 22.48 0 bottom
R705  100K  [R0201]  45.16 34.75 270 top
R706  0  [R0201]  57.73 28.07 90 top
R707  0  [R0201]  43.25 25.65 90 top
R708  0  [R0201]  43.89 25.65 90 top
R709  0  [R0603]  40.3 30.33 90 bottom
R710  0  [R0201]  44.52 34.75 270 top
R712  1.5K  [R0201]  45.79 34.75 270 top
R713  1.5K  [R0201]  46.43 34.75 270 top
R714  0  [R0201]  44.52 25.65 90 top
R715  0  [R0201]  45.16 25.65 90 top
R716  0  [R0402]  41.19 34.68 270 top
R718  0  [R0402]  42.21 34.72 90 top
R720  1M  [R0201]  55.95 30.99 90 top
R723  0  [R0402]  55.44 31.88 90 bottom
R803  0R  [R0201]  31.87 38.89 270 top
R806  0  [R0201]  21.53 48.01 270 top
R812  1.0K  [R0402]  43.23 34.72 90 top
R816  1K  [R0402]  65.96 30.38 270 bottom
R822  47K  [R0201]  33.09 40.79 180 top
R2569  0  [R0201]  47.06 34.75 270 top
R2570  0  [R0201]  47.7 34.75 270 top
R2579  0  [R0402]  61.79 32.64 90 top
R2580  0  [R0402]  62.81 32.64 90 top
R2581  4.7K  [R0201]  66.75 40.77 270 bottom
R2582  4.7K  [R0201]  68.02 40.77 270 bottom
R2583  4.7K  [R0201]  69.29 40.77 270 bottom
R2584  4.7K  [R0201]  70.56 40.77 270 bottom
R2585  100K  [R0402]  18.85 46.02 270 bottom
R2586  1K  [R0201]  67 37.08 0 bottom
R2587  1K  [R0201]  68.27 37.08 0 bottom
R2588  20K  [R0402]  17.83 46.23 90 bottom
R2589  1K  [R0201]  69.54 37.08 0 bottom
R2590  1K  [R0201]  70.81 37.08 0 bottom
R2591  100K  [R0201]  67 36.45 0 bottom
R2592  100K  [R0201]  68.27 36.45 0 bottom
R2593  100K  [R0201]  69.54 36.45 0 bottom
R2594  100K  [R0201]  70.81 36.45 0 bottom
R2595  100K_DNP  [R0402]  17.98 46.35 270 top
R2596  100K  [R0402]  16.96 46.35 90 top
R2597  3.3R  [R0402]  79.5 41.78 270 top
R2598  10K  [R0402]  85.8 46.1 270 bottom
R2599  10K  [R0402]  84.78 46.1 270 bottom
R2600  DNP  [R0402]  81.96 40.13 0 bottom
R2601  41.2K  [R0402]  82.24 42.93 90 bottom
R2602  DNP  [R0402]  83.26 42.93 90 bottom
R2603  5.6K  [R0402]  81.22 42.93 270 bottom
R2604  100K  [R0201]  74.09 45.59 0 top
R2605  100K  [R0201]  74.09 44.96 180 top
R2606  100K_DNP  [R0201]  74.09 43.69 180 top
R2607  10K  [R0201]  62.56 26.29 180 bottom
R2608  0R  [R0402]  45.54 59.44 90 top
R2609  330R  [R0402]  62.56 24.26 270 bottom
R2610  0R  [R0402]  39.44 59.44 270 top
R2611  0R_DNP  [R0402]  44.52 59.44 270 top
R2612  0R_DNP  [R0402]  38.43 59.44 270 top
R2613  1K_DNP  [R0201]  67.1 23.37 180 bottom
R2614  10K  [R0201]  67.1 24 180 bottom
R2619  4.7K  [R0201]  66.87 61.59 270 top
R2620  4.7K  [R0201]  67.89 61.59 270 top
R2621  4.7K  [R0201]  68.91 61.59 270 top
R2622  10K  [R0201]  62.05 54.99 90 bottom
R2623  1K  [R0201]  68.02 55.88 180 bottom
R2624  10K_DNP  [R0201]  67.13 55.63 270 bottom
R2625  10K_DNP  [R0201]  70.18 56.39 0 bottom
R2626  10K_DNP  [R0201]  71.7 59.31 270 top
R2627  1K  [R0201]  69.03 56.39 0 bottom
R2628  10K_DNP  [R0201]  66.42 56.01 90 bottom
R2629  1K  [R0201]  72.33 59.31 90 top
R2630  1M  [R0201]  91.64 49.4 180 top
R2631  0  [R0805]  86.43 46.61 180 top
R2632  0  [R0805]  86.43 48.64 180 top
R2633  100K  [R0201]  91.64 48.13 180 top
R2634  100K  [R0201]  91.64 47.5 180 top
R2635  100K  [R0201]  91.64 50.04 0 top
R2636  10K  [R0201]  94.46 45.85 270 top
R2637  100K  [R0201]  93.8 45.85 90 top
R2638  10K  [R0201]  96.21 52.2 90 top
R2639  100K  [R0201]  93.8 49.4 0 bottom
R2640  0  [R0201]  95.58 52.2 90 top
R2641  10K_DNP  [R0402]  95.83 46.1 180 top
R2642  10K  [R0201]  97.48 51.84 270 top
R2643  0  [R0201]  97.73 50.15 0 top
R2644  0  [R0201]  97.73 49.4 0 top
R2645  0R_DNP  [R0201]  94.43 56.13 270 bottom
R2646  0R_DNP  [R0201]  93.67 56.9 180 top
R2647  0R_DNP  [R0201]  12.77 9.4 90 top
R2648  0R_DNP  [R0201]  14.42 8.76 0 top
R2649  1.2M  [R0402]  17.22 10.16 180 bottom
R2650  1K  [R0201]  18.61 12.06 90 bottom
R2651  4.7K  [R0402]  12.9 14.22 0 bottom
R2652  1M  [R0402]  12.9 15.24 0 bottom
R2653  47K  [R0603]  12.85 14.61 0 top
R2654  324K  [R0402]  12.77 13.08 180 bottom
R2655  249K  [R0402]  16.58 12.32 90 bottom
R2656  0  [R0201]  8.28 19.68 0 top
R2658  0  [R0201]  8.02 22.86 180 top
R2659  10K  [R0201]  6.68 22.86 0 top
R2660  10K_DNP  [R0201]  7.31 37.21 0 top
R2661  10K  [R0201]  16.66 16.33 0 bottom
R2662  0  [R0201]  16.71 14.73 270 top
R2663  0  [R0201]  16.07 14.73 270 top
R2664  0R_DNP  [R0402]  9.88 24.08 270 bottom
R2665  1.5K  [R0201]  20.9 48.01 270 top
R2666  0R_DNP  [R0402]  8.86 24.08 270 bottom
R2667  0R_DNP  [R0402]  10.36 15.16 270 bottom
R2668  0R  [R0402]  10.36 14.2 270 bottom
R2669  1.5K  [R0201]  20.26 48.01 270 top
R2670  0R_DNP  [R0402]  9.85 20.7 90 bottom
R2671  0R_DNP  [R0402]  9.09 15.16 270 bottom
R2672  0R  [R0402]  9.09 14.2 270 bottom
R2673  0R_DNP  [R0402]  8.83 20.7 90 bottom
R2674  1.5K  [R0201]  18.99 48.01 270 top
R2675  1.5K_DNP  [R0201]  10.23 17.37 0 bottom
R2676  1.5K  [R0201]  19.63 48.01 270 top
R2677  1.5K_DNP  [R0201]  8.96 17.37 180 bottom
R2678  330R  [R0402]  82.49 21.16 180 top
R2679  0R  [R0402]  70.43 20.95 0 top
R2680  10K  [R0201]  75.64 34.04 270 bottom
R2681  10K  [R0201]  81.22 23.88 90 bottom
R2682  0R  [R0201]  72.59 26.8 0 top
R2683  0R  [R0201]  72.59 26.16 0 top
R2684  0R_DNP  [R0201]  72.59 27.43 180 top
R2685  2.49K_1%  [R0402]  71.83 21.59 270 top
R2686  0R_DNP  [R0201]  70.02 29.34 0 top
R2687  0R  [R0201]  70.05 28.7 180 top
R2688  4.7K_1%  [R0201]  75.84 33.66 90 top
R2689  4.7K_1%  [R0201]  79.45 33.8 90 top
R2690  4.7K_1%  [R0201]  80.46 33.8 90 top
R2691  2.2K  [R0402]  82.93 26.85 90 bottom
R2692  4.7K_1%  [R0201]  83.38 34.04 0 bottom
R2693  4.7K_1%  [R0201]  80.72 31.24 270 bottom
R2694  4.7K_1%  [R0201]  80.84 29.59 270 bottom
R2695  4.7K_1%  [R0201]  74.11 32.89 180 bottom
R2696  4.7K_1%  [R0201]  81.48 33.8 90 top
R2697  4.7K_1%  [R0201]  75 30.73 90 bottom
R2698  330R  [R0402]  87.57 20.7 90 top
R2699  330R  [R0402]  86.05 20.19 0 top
R2700  10K  [R0201]  86.96 32.38 0 bottom
R2701  10K  [R0201]  97.23 23.62 90 bottom
R2702  0R  [R0201]  89.23 26.67 0 top
R2703  0R  [R0201]  89.23 26.04 0 top
R2704  0R_DNP  [R0201]  89.23 27.3 180 top
R2705  2.49K_1%  [R0402]  88.59 24 180 top
R2706  4.7K_DNP  [R0201]  88.9 33.15 180 top
R2707  0R_DNP  [R0201]  86.58 29.18 0 top
R2708  4.7K_1%  [R0201]  92.15 32.38 90 top
R2709  0R  [R0201]  86.61 28.57 180 top
R2710  4.7K_1%  [R0201]  101.54 34.04 90 top
R2711  4.7K_DNP  [R0201]  100.91 34.04 90 top
R2712  4.7K_1%  [R0201]  102.31 34.04 90 top
R2713  2.2K  [R0402]  97.48 21.97 270 bottom
R2714  4.7K_1%  [R0201]  98.42 31.18 0 top
R2715  4.7K_1%  [R0201]  98.42 30.7 0 top
R2716  4.7K_1%  [R0201]  101.28 28.82 270 top
R2717  4.7K_1%  [R0201]  84.45 32.26 180 bottom
R2718  4.7K_1%  [R0201]  103.07 34.04 90 top
R2719  4.7K_1%  [R0201]  88.01 29.21 0 bottom
R2720  698R  [R0402]  32.58 14.61 270 top
R2721  33R  [R0402]  43.38 22.23 0 top
R2722  33R  [R0402]  43.38 23.24 0 top
R2724  10K  [R0201]  38.48 22.23 270 bottom
R2725  0R  [R0201]  42.08 25.35 0 top
R2726  0R  [R0201]  42.29 25.43 0 bottom
R2727  10K  [R0201]  41.09 17.14 270 bottom
R2728  1M  [R0402]  32.33 27.94 0 top
R2729  10K  [R0201]  40.58 18.8 180 bottom
R2730  2.2K  [R0402]  39.31 9.53 270 bottom
R2731  0R  [R0201]  40.58 19.43 180 bottom
R2732  2.2K  [R0402]  38.3 9.53 270 bottom
R2733  41.2K  [R0402]  38.17 2.92 270 bottom
R2734  100K  [R0201]  59.51 48.13 0 top
R2735  200K  [R0402]  55.82 50.16 270 top
R2736  44.2K  [R0402]  55.82 48.26 270 top
R2738  0R  [R0201]  62.94 54.1 90 bottom
R2739  0R  [R0201]  66.47 53.92 180 top
R2740  0R  [R0201]  62.81 49.15 90 bottom
R2741  0R  [R0201]  60.27 55.5 0 top
R2742  0R  [R0201]  60.27 54.86 0 top
R2743  0R  [R0201]  66.67 55.75 0 top
R2744  0R  [R0201]  66.67 56.26 0 top
R2745  10K  [R0201]  63.57 54.1 90 bottom
R2746  10K  [R0201]  63.44 35.05 90 top
R2747  10K  [R0201]  58.41 35.03 90 top
R2748  100  [R0201]  64.08 37.34 0 top
R2749  100  [R0201]  64.08 38.61 0 top
R2750  100  [R0201]  64.08 37.97 0 top
R2751  100  [R0201]  64.08 39.24 0 top
R2752  100  [R0201]  64.08 40.51 0 top
R2753  0  [R0201]  57.78 35.03 90 top
R2754  0  [R0201]  64.21 35.05 90 top
R2755  100  [R0201]  64.08 41.15 0 top
R2756  0  [R0201]  64.97 35.05 90 top
R2757  100  [R0201]  61.67 43.94 90 top
R2758  10K  [R0201]  59.76 44.96 270 top
R2759  100  [R0201]  60.4 43.81 90 top
R2760  100  [R0201]  59.76 43.81 90 top
R2761  0  [R0201]  61.64 35.03 90 top
R2762  100  [R0201]  57.86 43.81 90 top
R2763  0  [R0201]  60.4 35.03 90 top
R2764  15K  [R0402]  58.75 44.07 90 top
R2766  100  [R0201]  56.78 42.97 180 top
R2767  0  [R0201]  59.76 35.03 90 top
R2768  18K  [R0402]  58.75 45.97 90 top
R2769  0  [R0201]  62.4 35.03 90 top
R2770  100  [R0201]  55.82 41.53 180 top
R2771  100  [R0201]  55.82 40.89 180 top
R2772  100  [R0201]  55.82 40.01 180 top
R2773  100  [R0201]  55.82 38.61 180 top
R2774  100  [R0201]  55.82 39.37 180 top
R2775  100  [R0201]  56.15 35.66 270 top
R2776  187K  [R0402]  53.92 46.74 180 top
R2781  1K  [R0201]  52.9 51.18 270 top
R2782  1K  [R0201]  53.54 51.18 270 top
R2783  10K  [R0201]  50.87 51.18 90 top
R2784  41.2K  [R0402]  53.92 47.75 0 top
R2785  1K  [R0201]  54.17 51.18 270 top
R2786  100K  [R0201]  50.24 51.18 270 top
R2788  0R_DNP  [R0402]  11.73 55.24 270 bottom
R2789  0R_DNP  [R0402]  25.47 53.85 270 bottom
R2790  0R_DNP  [R0402]  24.46 53.85 270 bottom
R2791  0R_DNP  [R0402]  10.76 55.24 270 bottom
R2792  0R_DNP  [R0402]  9.8 55.24 270 bottom
R2793  0R_DNP  [R0402]  23.44 53.85 270 bottom
R2794  0R_DNP  [R0402]  8.83 55.24 270 bottom
R2795  0R_DNP  [R0402]  22.42 53.92 270 bottom
R2796  0R  [R0402]  11.73 56.25 90 bottom
R2797  0R  [R0402]  25.47 54.85 90 bottom
R2798  0R  [R0402]  10.76 56.25 90 bottom
R2799  0R  [R0402]  24.45 54.85 90 bottom
R2800  0R  [R0402]  9.8 56.25 90 bottom
R2801  0R  [R0402]  23.44 54.85 90 bottom
R2802  0R  [R0402]  8.83 56.25 90 bottom
R2803  0R  [R0402]  55.83 56.76 90 bottom
R2804  0R  [R0402]  54.81 56.76 90 bottom
R2805  0R  [R0402]  22.42 54.93 90 bottom
R2806  0R_DNP  [R0402]  55.82 54.36 270 bottom
R2807  0R_DNP  [R0402]  54.81 54.36 270 bottom
R2808  0R  [R0402]  53.66 56.38 90 bottom
R2809  0R  [R0402]  52.19 57.25 0 bottom
R2810  0R  [R0402]  10.1 29.47 0 bottom
R2811  0R  [R0402]  10.11 29.47 180 top
R2812  0R  [R0402]  49.98 57.28 180 bottom
R2813  0R  [R0402]  10.1 30.53 0 bottom
R2814  0R  [R0402]  10.11 30.53 180 top
R2815  0R  [R0402]  10.1 31.55 0 bottom
R2816  0R  [R0402]  10.11 31.55 180 top
R2817  0R  [R0402]  10.1 32.64 0 bottom
R2818  0R  [R0402]  10.11 32.64 180 top
R2819  0R  [R0402]  48.46 57.2 90 bottom
R2820  0R  [R0402]  47.44 57.2 90 bottom
R2821  0R  [R0402]  46.43 57.2 90 bottom
R2822  10K  [R0402]  49.93 55.24 180 bottom
R2823  10K  [R0402]  52.19 55.24 0 bottom
R2824  0R_DNP  [R0402]  53.66 55.38 270 bottom
R2825  0R_DNP  [R0402]  52.19 56.26 0 bottom
R2826  0R_DNP  [R0402]  49.93 56.26 180 bottom
R2827  0R_DNP  [R0402]  48.46 54.87 270 bottom
R2828  0R_DNP  [R0402]  47.44 54.87 270 bottom
R2829  0R_DNP  [R0402]  46.43 54.87 270 bottom
R2830  0  [R0402]  46.88 39.12 0 bottom
R2831  1K  [R0201]  55.95 43.56 270 top
R2832  0R  [R0402]  46.88 40.13 180 bottom
R2833  0R_DNP  [R0402]  46.88 41.15 180 bottom
R2834  0R  [R0402]  49.47 40.13 0 bottom
R2835  0R_DNP  [R0402]  49.47 41.15 180 bottom
R2836  0R  [R0402]  68.82 51.29 0 bottom
R2837  0R_DNP  [R0402]  69.29 50.79 270 bottom
R2838  0R  [R0402]  69.92 53.25 180 bottom
R2839  0R_DNP  [R0402]  69.46 52.75 270 bottom
R2840  1K  [R0201]  48.2 44.32 270 top
R2841  0  [R0402]  49.47 39.12 0 bottom
R2850  4.7K  [R0402]  43 40.26 0 bottom
R2851  0R_DNP  [R0402]  45.41 54.87 270 bottom
R2852  0  [R0201]  43.63 41.53 270 bottom
R2853  0R_DNP  [R0402]  51.5 41.15 180 bottom
R2854  0R  [R0402]  45.41 57.2 90 bottom
R2855  0R  [R0402]  51.5 40.13 180 bottom
R2856  0  [R0201]  38.81 41.27 270 bottom
R2857  0  [R0201]  38.17 41.27 270 bottom
R2858  0  [R0201]  45.54 38.43 90 bottom
R2859  10K  [R0201]  53.16 40.13 0 bottom
R2860  0R_DNP  [R0402]  60.71 49.36 180 bottom
R2861  0  [R0201]  36.9 41.27 270 bottom
R2862  10K  [R0201]  44.14 58.93 180 bottom
R2863  -  [R0201]  44.9 38.43 90 bottom
R2864  100  [R0201]  37.54 41.27 270 bottom
R2865  0R  [R0201]  42.59 42.01 0 bottom
R2866  0R_DNP  [R0402]  40.18 41.52 90 bottom
R2867  0R_DNP  [R0402]  41.19 41.52 90 bottom
R2868  -  [R0201]  41.73 54.61 270 bottom
R2870  0R  [R0402]  39.7 39.1 270 bottom
R2871  0R  [R0402]  40.71 39.1 270 bottom
R2873  10K  [R0201]  60.4 44.96 270 top
R2874  100K  [R0201]  30.1 61.98 270 top
R2875  200K  [R0402]  27.63 63.73 0 bottom
R2876  100K  [R0402]  29.54 63.73 0 bottom
R2877  0R_DNP  [R0402]  9.74 60.96 180 top
R2878  0R  [R0402]  10.24 61.42 270 top
R2881  10K  [R0201]  18.61 54.48 180 bottom
R2882  10K  [R0201]  18.61 55.5 180 bottom
R2883  51K_DNP  [R0201]  16.58 54.86 180 bottom
R2884  51K_DNP  [R0201]  16.58 55.5 180 bottom
R2885  100K_DNP  [R0201]  43.38 54.48 0 top
R2887  10K  [R0201]  44.85 54.33 90 top
R2888  1K  [R0201]  44.27 54.33 90 top
R2889  100K_DNP  [R0201]  47.88 54.99 270 top
R2890  6.6K  [R0402]  55.32 57.15 0 top
R2891  10K  [R0201]  46.68 55.21 90 top
R2892  1K  [R0201]  45.16 55.47 0 top
R2893  100K_DNP  [R0201]  46.05 55.74 270 top
R2894  1K_DNP  [R0201]  47.32 55.21 90 top
R2895  -  [R0201]  97.73 48.01 0 top
R2896  -  [R0201]  84.81 43.18 0 bottom
R2897  10K  [R0201]  84.54 42.19 90 bottom
R2898  -  [R0201]  84.05 40.26 270 bottom
R2899  0  [R0201]  85.3 42.19 270 bottom
R2900  0  [R0201]  86.36 35.56 0 top
R2901  0  [R0201]  85.05 40.53 0 bottom
R2902  0  [R0201]  87.7 44.83 270 top
R2903  0  [R0201]  84.67 34.04 0 bottom
R2904  0  [R0201]  88.34 44.83 270 top
R2905  0  [R0201]  86.36 34.29 0 top
R2906  0  [R0201]  97.99 46.99 90 top
R2907  0  [R0201]  97.99 45.21 90 top
R2908  -  [R0201]  97.35 45.21 90 top
R2909  -  [R0201]  97.35 46.99 90 top
R2910  270  [R0402]  27.25 5.84 180 bottom
R2911  150  [R0402]  26.87 11.3 180 bottom
R2912  270  [R0402]  20.65 5.84 180 bottom
R2913  150  [R0402]  20.9 11.18 180 bottom
R2914  5.1K  [R0201]  82.35 56.12 270 top
R2915  5.1K  [R0201]  78.94 56.08 270 top
R2916  1K  [R0201]  7.31 39.75 0 top
R2917  1K  [R0201]  7.31 38.48 180 top
R2918  10K  [R0201]  39.31 49.91 270 top
R2919  10K  [R0201]  37.66 49.33 180 top
R2922  0R  [R0201]  58.26 25.76 270 top
R2923  0R  [R0201]  59.89 25.76 270 top
R2924  0  [R0402]  83.89 33.91 180 top
R2925  0  [R0402]  89.15 34.54 90 top
R2926  62.0  [R0603]  99.13 43.05 0 top
R2927  0  [R0402]  98.88 37.21 0 top
R2928  10K  [R0201]  93.04 44.83 180 bottom
R2929  0  [R0402]  98.88 36.2 0 top
R2930  62.0  [R0603]  99.13 41.4 180 top
R2931  0  [R0201]  93.04 45.47 180 bottom
R2932  10K_DNP  [R0201]  93.04 46.1 0 bottom
R2933  0  [R0201]  8.28 20.32 0 top
R2934  0  [R0201]  16.7 14.74 270 bottom
R2935  0  [R0201]  16.09 14.74 270 bottom
R2936  100K  [R0201]  10.74 24 270 top
R2937  100K_DNP  [R0201]  8.28 21.59 0 top
R2938  0  [R0201]  8.28 20.95 0 top
R2939  0R_DNP  [R0805]  16.09 20.57 0 top
R2940  0R_DNP  [R0805]  16.09 20.57 0 bottom
R2941  240 OHM  [R0201]  25.64 28.22 90 bottom
R2942  0R  [R0201]  29.03 20.95 90 bottom
R2943  4.7K  [R0201]  69.29 44.07 180 bottom
R2945  0R  [R0201]  65.1 44.7 270 bottom
R2946  10K_DNP  [R0201]  74.09 44.32 180 top
R2947  56K  [R0201]  74.09 46.23 0 top
R2950  0R  [R0402]  82.49 20.19 180 top
R2951  330R  [R0402]  70.43 19.94 0 top
R2952  0R  [R0402]  88.59 20.7 90 top
R2953  0R  [R0402]  86.07 21.15 0 top
R2954  10K  [R0201]  58.8 45.85 0 bottom
R2955  -  [R0201]  6.93 55.12 270 top
R2956  100K_DNP  [R0201]  9.85 52.45 180 top
R2957  10K  [R0201]  9.85 53.21 0 top
R2958  10K  [R0201]  25.73 50.42 90 bottom
R2959  -  [R0201]  27.38 50.42 90 bottom
R2960  100K_DNP  [R0201]  26.36 50.42 270 bottom
R2961  0R  [R0201]  28.01 50.42 270 bottom
R2965  100K  [R0201]  59.38 15.54 270 top
R2966  6.6K  [R0402]  67 18.41 90 top
R2967  10K  [R0201]  58.75 16.18 270 top
R2969  10K  [R0201]  67 17.02 180 top
R2970  -  [R0201]  60.02 16.18 90 top
R2972  0R  [R0201]  37.66 48.69 0 top
R2973  0R  [R0201]  37.66 48.06 0 top
R2974  0R  [R0201]  37.66 47.42 0 top
R2975  0R  [R0201]  37.66 46.79 0 top
R2976  330R  [R0402]  58.44 18.44 0 bottom
R2977  0R  [R0402]  61.67 20.7 270 bottom
R2978  1K  [R0402]  52.52 14.22 0 bottom
R2979  10K  [R0201]  60.4 23.75 90 bottom
R2980  10K  [R0201]  59.51 23.75 90 bottom
R2981  10K  [R0201]  58.87 23.75 90 bottom
R2982  10K_DNP  [R0201]  57.63 25.76 90 top
R2983  10K_DNP  [R0201]  60.52 25.76 90 top
R2984  0R  [R0201]  58.06 18.87 180 top
R2985  10K  [R0201]  57.42 18.24 180 top
R2986  10K  [R0201]  58.31 17.98 270 top
R2987  0R_DNP  [R0201]  57.68 17.35 270 top
R2988  0R  [R0402]  10.1 35.69 0 top
R2990  0R  [R0402]  10.1 34.67 0 top
R2992  0R  [R0402]  10.1 36.7 0 top
R2993  0R  [R0402]  10.1 33.66 0 top
R2994  1.5K  [R0201]  8.71 35.81 270 top
R2995  1.5K  [R0201]  7.24 34.29 0 top
R2996  0R_DNP  [R0201]  42.08 24.71 0 top
R2997  0R_DNP  [R0201]  42.29 24.79 0 bottom
R2998  0R  [R0402]  9.87 26.04 90 bottom
R2999  0R  [R0402]  8.83 24.13 90 top
R3000  0R  [R0402]  8.86 26.04 90 bottom
R3001  0R  [R0402]  7.82 24.13 90 top
R3002  0R  [R0402]  69.29 42.67 270 bottom
R3005  100  [R0201]  64.08 41.78 0 top
R3015  10K  [R0201]  20.19 60.58 0 bottom
R3016  1K_DNP  [R0201]  43.89 55.5 270 top
R3017  0  [R0402]  70.3 50.79 90 bottom
R3018  0  [R0402]  69.92 54.27 180 bottom
R3019  200K  [R0201]  60.78 59.69 90 bottom
R3020  200K  [R0201]  60.14 60.83 270 bottom
R3021  0R  [R0201]  61.41 60.83 270 bottom
R3022  -  [R0201]  61.41 59.69 90 bottom
R3023  0R  [R0201]  29.03 57.91 0 bottom
R3024  0R  [R0201]  32.96 57.02 180 bottom
R3025  10K_DNP  [R0201]  29.92 59.94 270 bottom
R3026  10K  [R0201]  29.28 59.94 270 bottom
R3027  10K  [R0201]  33.02 61.21 180 bottom
R3028  0  [R0402]  58.8 49.36 0 bottom
R3029  0R  [R0201]  16.84 59.94 180 bottom
R3030  -  [R0201]  15.69 59.94 0 bottom
R3031  10K  [R0201]  40.76 53.8 180 bottom
R3032  100  [R0201]  55.82 37.85 180 top
R3033  0R_DNP  [R0201]  72.72 54.86 270 top
R3034  0R  [R0201]  66.37 54.28 0 bottom
R3035  0R_DNP  [R0201]  66.37 53.64 0 bottom
R3036  0R  [R0201]  72.08 54.86 270 top
R3037  0R_DNP  [R0402]  44.39 54.86 270 bottom
R3038  0R  [R0402]  43.89 57.2 90 bottom
R3039  0R_DNP  [R0201]  59.51 48.77 180 top
R3040  100  [R0201]  57.22 43.81 90 top
R3041  100K_DNP  [R0201]  59.51 49.4 180 top
R3042  1M  [R1206]  73.48 22.99 180 bottom
R3043  1M  [R1206]  87.45 25.91 270 bottom
R3044  100  [R0201]  55.52 35.66 270 top
R3045  0R_DNP  [R0201]  81.86 24.41 270 bottom
R3046  0R_DNP  [R0201]  74.37 34.04 270 bottom
R3047  0R  [R0201]  82.49 24.41 270 bottom
R3048  0R  [R0201]  75 34.04 270 bottom
R3049  0R  [R0201]  96.71 26.04 0 bottom
R3050  0R_DNP  [R0201]  97.73 26.04 180 bottom
R3051  0R_DNP  [R0201]  91.89 34.04 270 top
R3052  0R  [R0201]  92.53 34.04 270 top
R3053  100  [R0201]  64.08 39.88 0 top
R3054  100  [R0201]  60.96 44.96 90 top
R3055  10K  [R0201]  53.72 55.75 90 top
R3056  -  [R0201]  47.96 56.13 90 top
R3057  10K  [R0201]  43.05 59.94 0 top
R3058  10K  [R0201]  38.48 57.66 0 top
R3059  10K  [R0201]  103.76 34.04 270 top
R3060  10K  [R0201]  103.19 29.08 180 top
SW1  CHS-04TA  [SW_CHS_04_A]  68.52 37.47 90 top
SW3  SW_SMT_2  [SW_SMT_4]  41.47 38.1 270 top
SW4  SW_SMT_1  [SW_2P8X5P4_SM]  91.82 42.8 270 top
TP202  TPAD_020  [TPAD_015]  18.11 36.58 180 bottom
TP408  TPAD_020  [TPAD_015]  10.7 37.49 270 top
TP410  TPAD_020  [TPAD_015]  11.17 40.41 180 top
TP411  TPAD_020  [TPAD_015]  11.17 41.12 180 top
TP412  -  [TPAD_015]  12.42 43.74 90 top
TP417  -  [TPAD_015]  11.87 46.86 180 top
TP702  tpad_020  [TPAD_020]  50.87 17.27 180 top
TP703  tpad_020  [TPAD_020]  40.08 27.94 180 top
TP706  tpad_020  [TPAD_020]  48.01 37.34 180 top
TP707  tpad_020  [TPAD_020]  54.68 35.93 180 top
TP708  tpad_020  [TPAD_020]  50.36 20.83 180 top
TP709  tpad_020  [TPAD_020]  55.06 27.18 180 top
TP710  tpad_020  [TPAD_020]  56.08 25.15 180 top
TP711  tpad_020  [TPAD_020]  52.9 23.29 180 top
TP712  tpad_020  [TPAD_020]  55.06 25.65 180 top
TP713  tpad_020  [TPAD_020]  54.05 23.24 180 top
TP714  TP_35MIL  [TPAD_015]  55.06 28.07 180 top
TP915  tpad_020  [TPAD_020]  58.75 27.56 180 top
TP916  tpad_020  [TPAD_020]  43.38 41.4 0 top
TP917  TPAD_020  [TPAD_1212]  78.23 45.09 270 bottom
TP918  TPAD_020  [TPAD_1212]  81.35 50.55 270 bottom
TP919  TPAD_020  [TPAD_1212]  62.17 56.39 180 bottom
TP920  tpad_020  [TPAD_020]  88.59 46.61 90 top
TP921  TPAD_020  [TPAD_015]  90.88 46.86 180 top
TP922  TPAD_020  [TPAD_015]  92.78 48.64 90 top
TP923  TPAD_020  [TPAD_015]  92.78 47.5 90 top
TP924  TPAD_020  [TPAD_015]  97.94 51.05 90 top
TP925  TPAD_020  [TPAD_015]  97.48 48.64 90 top
TP926  TPAD_020  [TPAD_015]  97.23 51 90 top
TP927  TPAD_020  [TPAD_015]  92.65 54.36 0 top
TP928  TPAD_020  [TPAD_015]  14.68 11.94 90 top
TP932  TPAD_020  [TPAD_015]  17.37 15.01 0 top
TP933  TPAD_020  [TPAD_015]  15.29 14.22 0 top
TP934  TPAD_020  [TPAD_015]  49.35 51.31 180 top
TP935  TPAD_020  [TPAD_015]  16.28 58.42 90 bottom
TP936  TPAD_020  [TPAD_015]  15.57 59.18 90 bottom
TP937  TPAD_020  [TPAD_015]  15.44 57.28 90 bottom
TP938  TPAD_020  [TPAD_015]  16.2 57.73 90 bottom
TP1015  TPAD_020  [TPAD_015]  55.9 24.38 270 top
TP1016  TPAD_020  [TPAD_015]  55.32 20.02 270 top
TP1017  TPAD_020  [TPAD_015]  55.24 19.05 270 top
TP1018  TPAD_020  [TPAD_015]  55.98 18.44 270 top
TP1019  TPAD_020  [TPAD_015]  21.97 50.19 0 top
TP1020  TPAD_020  [TPAD_015]  14.17 54.99 180 bottom
TP1021  TPAD_020  [TPAD_015]  15.44 54.99 180 bottom
TP1022  tpad_020  [TPAD_020]  83.44 51.82 180 bottom
TP1023  tpad_020  [TPAD_020]  79.7 35.94 0 top
TP1024  tpad_020  [TPAD_020]  93.09 58.04 180 bottom
TP1025  tpad_020  [TPAD_020]  93.09 59.05 180 bottom
TP1026  tpad_020  [TPAD_020]  93.6 55.88 180 bottom
TP1027  tpad_020  [TPAD_020]  91.69 52.07 180 bottom
TP1028  tpad_020  [TPAD_020]  81.92 53.85 180 bottom
TP1029  tpad_020  [TPAD_020]  39.62 4.7 180 bottom
TP1030  tpad_020  [TPAD_020]  79.76 44.58 180 bottom
TP1031  tpad_020  [TPAD_020]  12.95 8.13 180 bottom
TP1032  tpad_020  [TPAD_020]  20.32 53.21 180 bottom
TP1033  tpad_020  [TPAD_020]  11.81 8.13 180 bottom
TP1034  tpad_020  [TPAD_020]  14.61 8.76 180 bottom
TP1037  tpad_020  [TPAD_020]  76.71 40.01 180 bottom
TP1038  tpad_020  [TPAD_020]  65.91 20.19 180 bottom
TP1039  tpad_020  [TPAD_020]  46.35 59.82 180 bottom
TP1040  tpad_020  [TPAD_020]  39.88 58.29 180 bottom
TP1041  tpad_020  [TPAD_020]  15.62 45.97 180 bottom
TP1042  tpad_020  [TPAD_020]  82.04 58.42 180 bottom
TP1043  tpad_020  [TPAD_020]  72.77 36.7 180 bottom
TP1046  tpad_020  [TPAD_020]  54.1 14.22 180 bottom
TP1047  tpad_020  [TPAD_020]  28.42 11.3 180 bottom
TP1048  tpad_020  [TPAD_020]  22.38 11.2 180 bottom
TP1049  tpad_020  [TPAD_020]  46.48 27.3 180 bottom
TP1050  tpad_020  [TPAD_020]  67.23 51.05 180 bottom
TP1051  tpad_020  [TPAD_020]  66.54 51.05 180 bottom
TP1052  tpad_020  [TPAD_020]  66.31 52.07 180 bottom
TP1053  tpad_020  [TPAD_020]  65.63 52.07 180 bottom
TP1054  tpad_020  [TPAD_020]  61.21 48.26 180 bottom
TP1055  tpad_020  [TPAD_020]  60.33 48.26 180 bottom
TP1056  tpad_020  [TPAD_020]  41.15 34.54 180 bottom
TP1057  tpad_020  [TPAD_020]  62 53.77 180 bottom
TP1058  tpad_020  [TPAD_020]  56.01 33.91 180 bottom
TP1059  tpad_020  [TPAD_020]  69.72 25.65 180 bottom
TP1060  tpad_020  [TPAD_020]  97.79 49.66 180 bottom
TP1061  tpad_020  [TPAD_020]  97.79 48.64 180 bottom
TP1062  tpad_020  [TPAD_020]  57.02 53.34 180 bottom
TP1063  tpad_020  [TPAD_020]  67.56 52.96 180 bottom
TP1064  tpad_020  [TPAD_020]  65.15 55.12 180 bottom
TP1065  tpad_020  [TPAD_020]  57.78 51.18 180 bottom
TP1066  tpad_020  [TPAD_020]  55.24 20.19 180 bottom
TP1067  tpad_020  [TPAD_020]  51.56 37.34 180 bottom
TP1068  tpad_020  [TPAD_020]  73.07 47.85 180 bottom
TP1069  tpad_020  [TPAD_020]  72.38 47.85 180 bottom
TP1070  tpad_020  [TPAD_020]  72.63 49.66 180 bottom
TP1071  tpad_020  [TPAD_020]  71.94 49.66 180 bottom
TP1072  tpad_020  [TPAD_020]  74.42 47.85 180 bottom
TP1073  tpad_020  [TPAD_020]  75.1 47.85 180 bottom
TP1074  tpad_020  [TPAD_020]  73.02 52.62 180 bottom
TP1075  tpad_020  [TPAD_020]  72.33 52.62 180 bottom
TP1076  tpad_020  [TPAD_020]  71.95 57.89 180 bottom
TP1077  tpad_020  [TPAD_020]  71.95 57.2 180 bottom
TP1078  tpad_020  [TPAD_020]  56.26 35.81 180 bottom
TP1079  tpad_020  [TPAD_020]  65.91 37.08 180 bottom
TP1080  tpad_020  [TPAD_020]  67.94 37.97 180 bottom
TP1081  tpad_020  [TPAD_020]  69.22 37.97 180 bottom
TP1082  tpad_020  [TPAD_020]  70.48 37.97 180 bottom
TP1083  tpad_020  [TPAD_020]  37.01 38.13 180 bottom
